# Altium PCB DT.PcbDoc (part 1 of 2)
Units mil, origin at the board's own origin, x right, y up, seen from the top; angles counter-clockwise.
Board outline 1771.65 x 787.4 mil, 2 copper layers (Top Layer, Bottom Layer), stack 57 mil thick; 61 components, 48 nets, 194 pads, 36 vias.
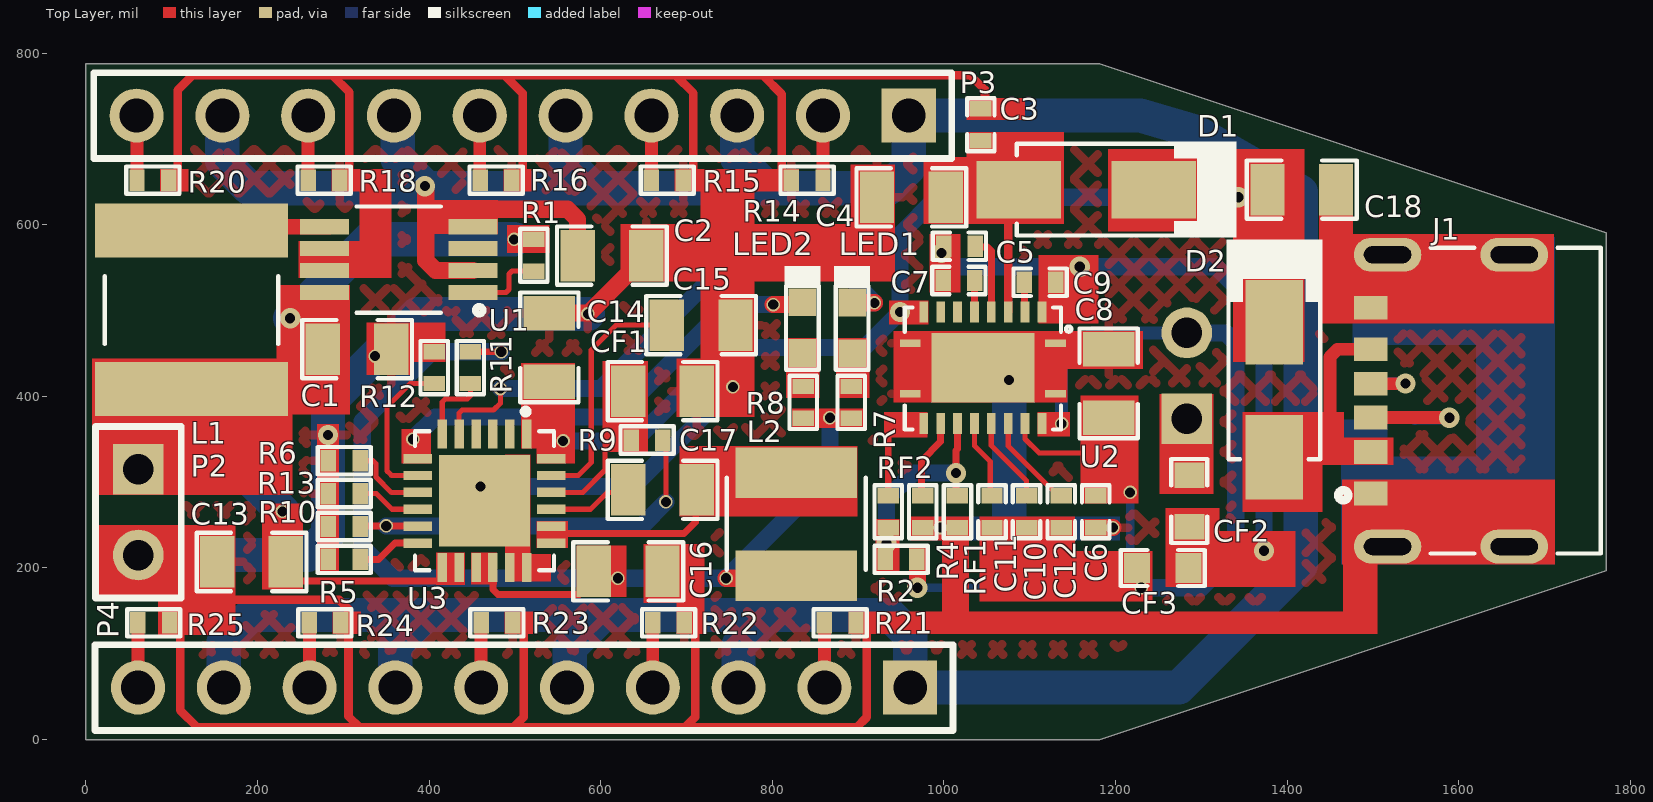
[diagram p0: Top Layer view]
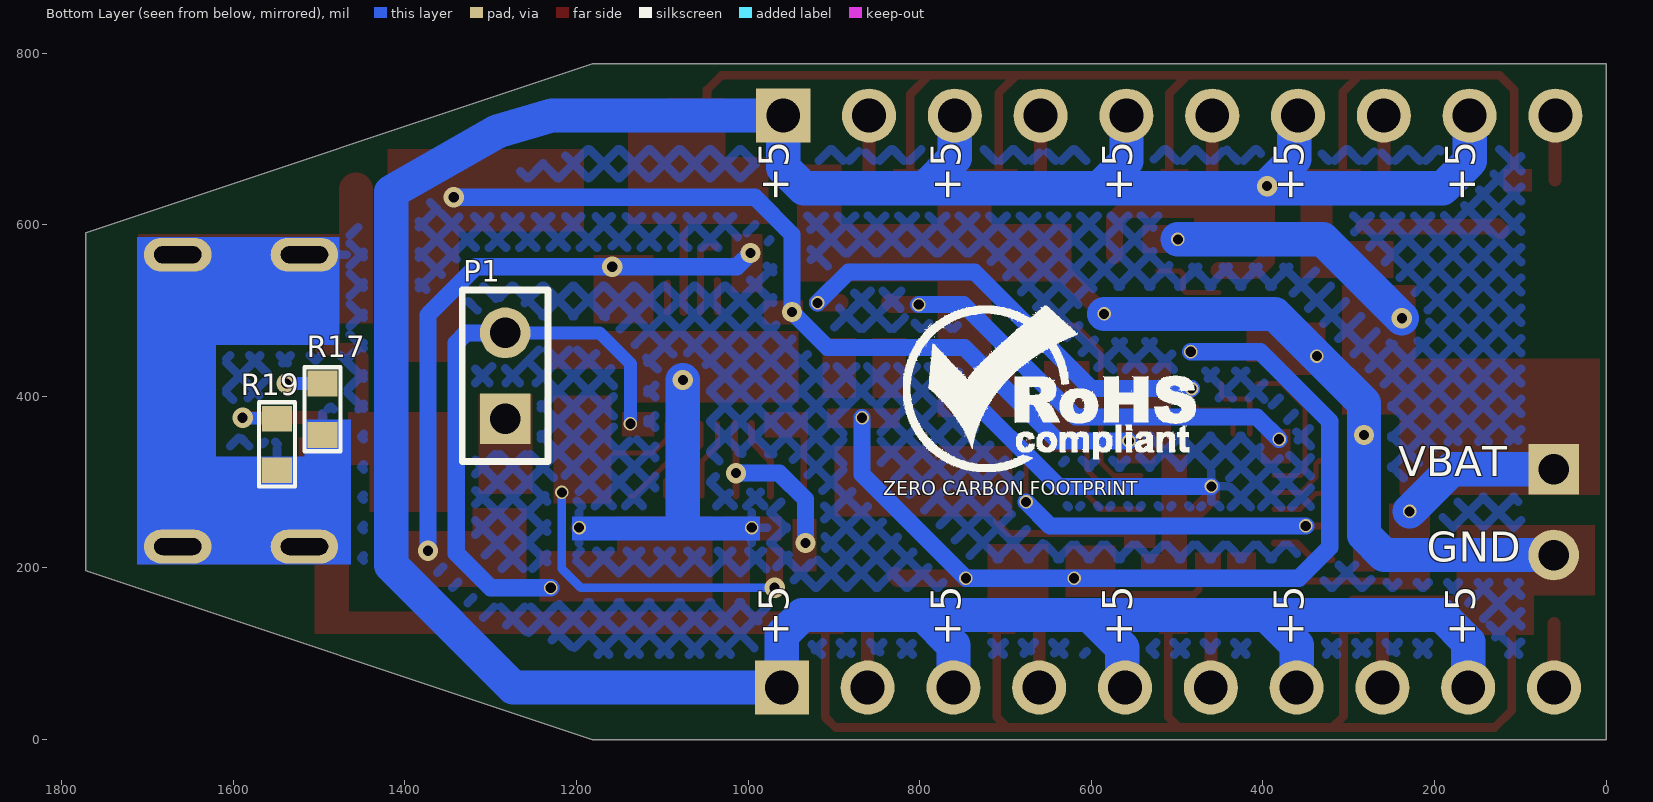
[diagram p1: Bottom Layer view, seen from below]
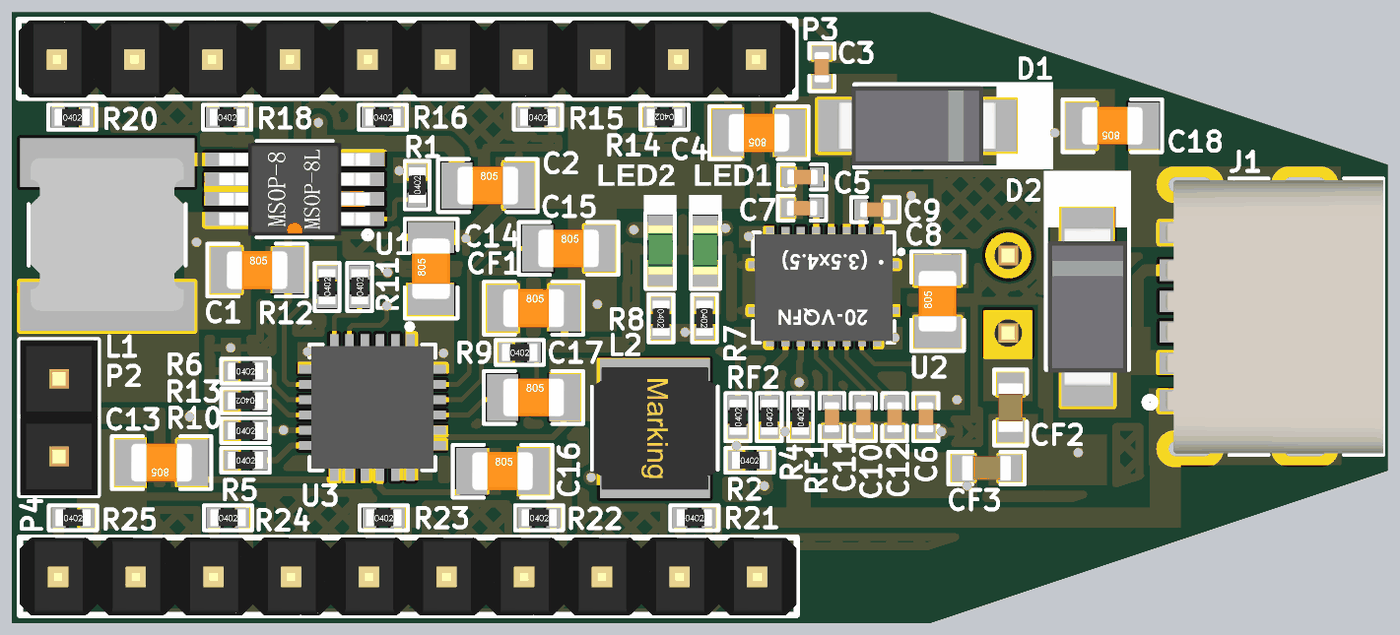
[diagram p2: 3D render of the assembled board from above, using the file's embedded part models]
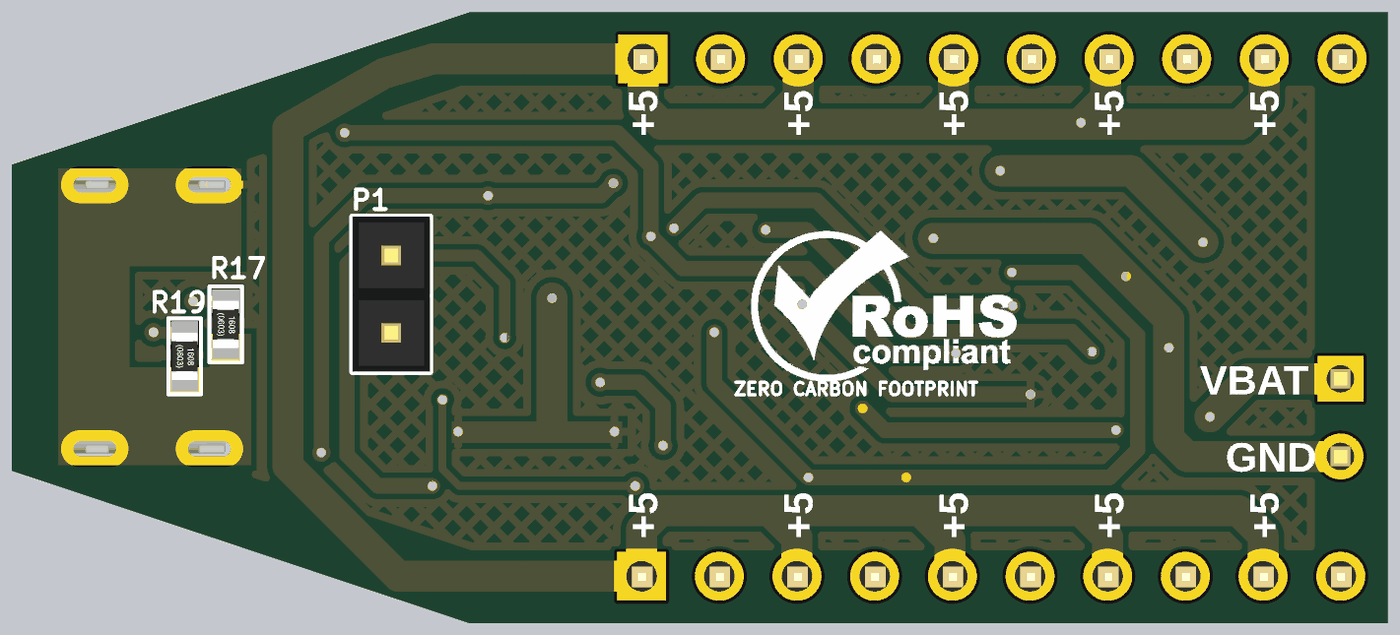
[diagram p3: 3D render of the assembled board from below, using the file's embedded part models]

## Layer stack, top to bottom
Top Solder: solder mask 3, Solder Resist, Dk 3.5
Top Layer: signal copper 10
Dielectric 1: dielectric 37, FR-4, Dk 4.8
Bottom Layer: signal copper 10
Bottom Solder: solder mask 3, Solder Resist, Dk 3.5

## Board outline
0,0 1181.1,0 1771.65,196.85 1771.65,590.55 1181.1,787.4 0,787.4

## Design rules (kind name [scope] priority, off if disabled: settings)
Clearance [All] p1: gap=7 ignorepadtopadclearanceinfootprint=FALSE except(0: Arc-Hole Track-Hole SMDPad-Hole THPad-Hole Via-Hole Fill-Hole Poly-Hole Region-Hole Text-Hole; 4: Arc-SMDPad Track-SMDPad SMDPad-SMDPad)
HoleSize [All] p1: absolutevalues=TRUE maxlimit=1000 minlimit=1 maxpercent=80.000 minpercent=20.000
HoleToHoleClearance [All] p1: gap=0 allowstackedmicrovias=TRUE
MinimumSolderMaskSliver [All] p1: minsoldermaskwidth=0
PolygonConnect [All] p1: connectstyle=Relief reliefconductorwidth=10 reliefentries=4 polygonreliefangle="90 Angle" airgapwidth=10
RoutingVias [All] p1: holewidth=11.81 width=23.62 viastyle="Through Hole" minholewidth=11.81 minwidth=15.75 maxholewidth=11.81 maxwidth=23.62
SilkToSilkClearance [All] p1: silktosilkclearance=0
SilkToSolderMaskClearance [IsPad] p1: minsilkscreentomaskgap=0 clearancetoexposedcopper=TRUE
SolderMaskExpansion [All] p1: expansion=4 istentingtop=FALSE
Width [All] p1: maxlimit=40 minlimit=6 preferedwidth=20
25 further rules are at their usual default settings.

## Classes and differential pairs
component class U_Power_Section: C1 C2 L1 R1 U1
component class U_Connector_Section: C18 D2 J1 P2 P3 P4 R14 R15 R16 R17 R18 R19 R20 R21 R22 R23 R24 R25
component class U_Battery_Charging_Section: C3 C4 C5 C6 C7 C8 C9 C10 C11 C12 C13 C14 C15 C16 C17 CF1 CF2 CF3 D1 L2 LED1 LED2 P1 R2 R4 R5 R6 R7 R8 R9 R10 R11 R12 R13 RF1 RF2 U2 U3

## Components (designator, comment, footprint, x,y, rotation, side; value= is the part's Value field where it differs from the comment)
C1 "10uF" Cap0805 316,455 r0 top locked
C2 "10uF" Cap0805 613,564 r0 top locked
C3 "0.1uF" Cap0402 1043,716.5 r90 top locked
C4 "10uF" Cap0805 962,632 r180 top locked
C5 "0.47uF" Cap0402 1018,575 r0 top locked
C6 "0.1uF" Cap0402 1177,265.5 r270 top locked
C7 "0.022UF" Cap0402 1017.5,535 r0 top locked
C8 "10uF" Cap0805 1192,415 r90 top locked
C9 "10nF" Cap0402 1112,533 r180 top locked
C10 "0.47uF" Cap0402 1096.33,265.5 r90 top locked
C11 "0.022UF" Cap0402 1056,265.5 r90 top locked
C12 "10nF" Cap0402 1136.67,265.5 r90 top locked
C13 "10uF" Cap0805 193,207 r180 top locked
C14 "1uF" Cap0805 540,457 r90 top locked
C15 "10uF" Cap0805 717,483 r0 top locked
C16 "10uF" Cap0805 632,196 r0 top locked
C17 "47nF" Cap0805 672,291 r0 top locked
C18 "1uF" Cap0805 1417,641 r180 top locked
CF1 "4.7uF" Cap0805 672,406 r0 top locked
CF2 "150nF" "Cap 0603" 1286,278 r90 top locked
CF3 "2.2nF" "Cap 0603" 1255,200 r0 top locked
D1 "SK56A-LTP" SMA 1166,641 r180 top locked
D2 "SK56A-LTP" SMA 1385,407.74 r270 top locked
J1 "U262-061N-4BVC11" U262-061N-4BVC11 1581,395 r90 top locked
L1 "4.7uH" SRN5020-4R7M 123,501 r90 top locked
L2 "1uH" 74404041010 828,251 r270 top locked
LED1 "LT Q39E-Q1OO-25-1" "LED 0603" 893,479.91 r90 top locked
LED2 "LT Q39E-Q1OO-25-1" "LED 0603" 835,480 r90 top locked
P1 "61300211121" HDR1X2 1283,374 r90 bottom locked
P2 "61300211121" HDR1X2 61,315 r270 top locked
P3 "M20-9991045" HDR1X10 958.98,727.24 r180 top locked
P4 "M20-9991045" HDR1X10 960.63,60.63 r180 top locked
R1 "1M" Res0402 522,564.5 r90 top locked
R2 "20K" Res0402 950,210 r0 top locked
R4 "10K" Res0402 975.33,265.5 r90 top locked
R5 "10K" Res0402 301,210 r0 top locked
R6 "10K" Res0402 301,325 r0 top locked
R7 "2.21K" Res0402 892,393 r270 top locked
R8 "10K" Res0402 836,393 r270 top locked
R9 "10K" Res0402 654,349 r0 top locked
R10 "10K" Res0402 301,248.33 r0 top locked
R11 "10K" Res0402 448,433.5 r90 top locked
R12 "158R" Res0402 406,433.5 r90 top locked
R13 "221R" Res0402 301,286.67 r180 top locked
R14 "1K" Res0402 840.5,652 r180 top locked
R15 "1K" Res0402 677.5,652 r0 top locked
R16 "1K" Res0402 478,652 r0 top locked
R17 "5.1K" Res0603 1496,385 r90 bottom locked
R18 "1K" Res0402 277.5,652 r0 top locked
R19 "5.1K" Res0603 1549,344 r90 bottom locked
R20 "1K" Res0402 78,652 r0 top locked
R21 "1K" Res0402 879,136 r0 top locked
R22 "1K" Res0402 679,136 r0 top locked
R23 "1K" Res0402 479,136 r0 top locked
R24 "1K" Res0402 278.5,136 r0 top locked
R25 "1K" Res0402 79,136 r0 top locked
RF1 "196R" Res0402 1015.67,265.5 r90 top locked
RF2 "66.5R" Res0402 935,265.5 r90 top locked
U1 "MCP1643T-I/MS" 8-MSOP 364.39,559.39 r180 top locked
U2 "BQ51013BRHLR" 20QFN 1045.35,433.46 r270 top locked
U3 "BQ25616JRTWR" "24-WQFN (4x4)" 464.47,278.24 r270 top locked

## Footprints (in the part's own frame and the unit in brackets; to place one, negate y for a bottom-side part, rotate by r counter-clockwise, add the part's x,y. Pads: shape width x height; smd on the part's side, far side on the other; paste and mask are expansions set on the pad)
8-MSOP [mm]
  rect 1.45x0.45 smd: 1(-2.2,0.975) 2(-2.2,0.325) 3(-2.2,-0.325) 4(-2.2,-0.975) 5(2.2,-0.975) 6(2.2,-0.325) 7(2.2,0.325) 8(2.2,0.975)
  silkscreen extent -2.5,-1.57 1.24,1.61, body extent -2.46,-1.53 2.46,1.53, height 1.01
20QFN [mm]
  rect 0.22x0.62 smd: 1(-0.725,2.15) 10(-0.725,-2.15) 11(0.775,-2.15) 20(0.775,2.15)
  rect 0.62x0.26 smd: 2(-1.65,1.75) 3(-1.65,1.25) 4(-1.65,0.75) 5(-1.65,0.25) 6(-1.65,-0.25) 7(-1.65,-0.75) 8(-1.65,-1.25) 9(-1.65,-1.75) 12(1.65,-1.75) 13(1.65,-1.25) 14(1.65,-0.75) 15(1.65,-0.25) 16(1.65,0.25) 17(1.65,0.75) 18(1.65,1.25) 19(1.65,1.75)
  rect 2.05x3.05 smd: 21(0,0)
  silkscreen extent -1.78,-2.31 1.83,2.62, body extent -1.73,-2.26 1.79,2.26, height 0.88
"24-WQFN (4x4)" [mm]
  rect 0.85x0.28 smd: 1(-1.975,1.25) 2(-1.975,0.75) 3(-1.975,0.25) 4(-1.975,-0.25) 5(-1.975,-0.75) 6(-1.975,-1.25) 13(1.975,-1.25) 14(1.975,-0.75) 15(1.975,-0.25) 16(1.975,0.25) 17(1.975,0.75) 18(1.975,1.25)
  rect 0.28x0.85 smd: 7(-1.25,-1.975) 8(-0.75,-1.975) 9(-0.25,-1.975) 10(0.25,-1.975) 11(0.75,-1.975) 12(1.25,-1.975) 19(1.25,1.975) 20(0.75,1.975) 21(0.25,1.975) 22(-0.25,1.975) 23(-0.75,1.975) 24(-1.25,1.975)
  rect 2.7x2.7 smd: 25(0,0)
  silkscreen extent -2.72,-2.06 2.06,2.06, body extent -2,-2 2,2, height 0.78
74404041010 [mm]
  rect 1.5x3.6 smd: 1(-1.525,0) 2(1.525,0)
  silkscreen extent -1.37,-2.06 1.35,2.06, body extent -2,-2 2,2, height 1.17
Cap0402 [mil]
  rect 18x25 smd mask+2.36: 1(-18.5,0) 2(18.5,0)
  silkscreen extent -31,-16 31,16, body extent -20,-10 20,10, height 19
Cap0805 [mil] "SMD 0805"
  rect 40x60 smd mask+2.76: 1(-40,0) 2(40,0)
  silkscreen extent -64,-34 64,34, body extent -39,-25 39,25, height 30
"Cap 0603" [mil]
  rect 30x35 smd mask+2.36: 1(-30,0) 2(30,0)
  silkscreen extent -49,-21 49,21, body extent -32,-16 31,16, height 34
HDR1X2 [mm] "CONN HEADER VERT 2POS 2.54MM"
  rect 1.5x1.5 hole 0.9: 1(0,0)
  round 1.5 hole 0.9: 2(2.54,0)
  silkscreen extent -1.27,-1.27 3.81,1.27, body extent -1.27,-1.27 3.81,1.27, height 8.44
HDR1X10 [mm] "Connector; Header; 10 Position"
  rect 1.6x1.6 hole 1: 1(0,0)
  round 1.6 hole 1: 2(2.54,0) 3(5.08,0) 4(7.62,0) 5(10.16,0) 6(12.7,0) 7(15.24,0) 8(17.78,0) 9(20.32,0) 10(22.86,0)
  silkscreen extent -1.27,-1.27 24.13,1.27, body extent -1.27,-1.27 24.13,1.27, height 9.4
"LED 0603" [mm] "LED 0603"
  rect 0.82x0.82 smd: 1(-0.75,0) 2(0.75,0)
  silkscreen extent -1.24,-0.53 1.83,0.53, body extent -0.77,-0.4 0.83,0.4, height 0.38
Res0402 [mil]
  rect 18x25 smd mask+4: 1(-18.5,0) 2(18.5,0)
  silkscreen extent -32,-17 32,16, body extent -23,-11 23,11, height 16
Res0603 [mil]
  rect 30x35 smd: 1(-30,0) 2(30,0)
  silkscreen extent -49,-21 49,21, body extent -31,-17 31,17, height 18
SMA [mm]
  rect 2.5x1.7 smd: 1(-2,0) 2(2,0)
  silkscreen extent -4.45,-1.42 2.06,1.42, body extent -2.6,-1.3 2.6,1.3, height 2.4
SRN5020-4R7M [mm]
  rect 1.6x5.7 smd: 1(-2.35,0) 2(2.35,0)
  silkscreen extent -1.02,-2.57 0.99,2.57, body extent -2.5,-2.5 2.5,2.5, height 2
U262-061N-4BVC11 [mm]
  rect 0.7x1 smd: A5(0.5,2.125) A9(1.52,2.125) A12(2.75,2.125) B5(-0.5,2.125) B9(-1.52,2.125) B12(-2.75,2.125)
  oval 1x2 hole 0.5 slot 1.4 at 90 deg: MH1(-4.32,1.625) MH2(4.32,1.625) MH3(4.32,-2.125) MH4(-4.32,-2.125)
  silkscreen extent -4.52,-4.69 4.52,3.09, body extent -4.47,-4.69 4.47,2.4, height 3.3

## Part data
C1 C2 C15 C16: library part TMK212BBJ106KGHT, "CAP CER 10UF 25V X5R 0805", Case Code (Imperial)=0805, Case Code (Metric)=2012, Dielectric=X5R, Manufacturer="Taiyo Yuden", Max Operating Temperature=85°C, Min Operating Temperature=-55°C, Package Quantity=3000, Ratings=AEC-Q200, Supplier Part Number 1=95Y2170, Tolerance=10%, Voltage Rating=25V, Capacitance=10uF, Case/Package=0805, Category="Ceramic Capacitors", ComponentLink1Description=http://www.mouser.com/ds/2/396/mlcc11_hq_e-541564.pdf?src-supplier=Mouser, ComponentLink1URL=http://www.mouser.com/ds/2/396/mlcc11_hq_e-541564.pdf?src-supplier=Mouser, ComponentLink2Description=https://www.yuden.co.jp/productdata/catalog/mlcc_all_hq_e.pdf?src-supplier=Digi-Key, ComponentLink2URL=https://www.yuden.co.jp/productdata/catalog/mlcc_all_hq_e.pdf?src-supplier=Digi-Key, ComponentLink3Description=http://ds.yuden.co.jp/TYCOMPAS/ut/detail.do?productNo=TMK212BBJ106KGHT&fileName=TMK212BBJ106KGHT_SS&mode=specSheetDownload&src-supplier=Digi-Key, ComponentLink3URL=http://ds.yuden.co.jp/TYCOMPAS/ut/detail.do?productNo=TMK212BBJ106KGHT&fileName=TMK212BBJ106KGHT_SS&mode=specSheetDownload&src-supplier=Digi-Key, ComponentLink4Description=http://ds.yuden.co.jp/TYCOMPAS/ut/detail.do?productNo=TMK212BBJ106KGHT&dataUnit=M&src-supplier=Avnet, ComponentLink4URL=http://ds.yuden.co.jp/TYCOMPAS/ut/detail.do?productNo=TMK212BBJ106KGHT&dataUnit=M&src-supplier=Avnet, Height=1.25mm, Length=0.079inch, Manufacturer Part Number=TMK212BBJ106KGHT, Mount="Surface Mount", Packaging="Tape and Reel", Pricing 1="1=0.06100, 25=0.06100, 50=0.06100, 100=0.06100, 250=0.06100, 500=0.05600 (USD)", RoHS=Yes, RoHS Compliant=Yes, Stock 1=26354, Supplier 1=Newark, Termination=SMD/SMT, Thickness=0.053inch, Voltage Rating (DC)=25V, Weight=0.000194oz, Width=0.049inch
C3 C6: library part GCM155R71C104KA55D, "CAP CER 0.1UF 16V X7R 0402", Capacitance=100nF, Case Code (Imperial)=0402, Case Code (Metric)=1005, Dielectric=X7R, Manufacturer=Murata, Max Operating Temperature=125°C, Min Operating Temperature=-55°C, Package Quantity=1, Ratings=AEC-Q200, Tolerance=10%, Voltage=16V, Case/Package=0402, Category="Ceramic Capacitors", ComponentLink1Description=https://datasheet.ciiva.com/11786/0900766b80ef92d0-11786380.pdf?src-supplier=RSComponents, ComponentLink1URL=https://datasheet.ciiva.com/11786/0900766b80ef92d0-11786380.pdf?src-supplier=RSComponents, ComponentLink2Description=https://datasheet.ciiva.com/18183/getdatasheetpartid-220774-18183517.pdf?src-supplier=Verical, ComponentLink2URL=https://datasheet.ciiva.com/18183/getdatasheetpartid-220774-18183517.pdf?src-supplier=Verical, ComponentLink3Description=https://datasheet.ciiva.com/164/product-164315.pdf?src-supplier=Digi-Key, ComponentLink3URL=https://datasheet.ciiva.com/164/product-164315.pdf?src-supplier=Digi-Key, ComponentLink4Description=https://datasheet.ciiva.com/164/product-164316.pdf?src-supplier=Digi-Key, ComponentLink4URL=https://datasheet.ciiva.com/164/product-164316.pdf?src-supplier=Digi-Key, ComponentLink5Description=https://datasheet.ciiva.com/11463/product-11463804.pdf?src-supplier=Avnet, ComponentLink5URL=https://datasheet.ciiva.com/11463/product-11463804.pdf?src-supplier=Avnet, ComponentLink6Description=https://datasheet.ciiva.com/2989/product-2989234.pdf?src-supplier=Avnet, ComponentLink6URL=https://datasheet.ciiva.com/2989/product-2989234.pdf?src-supplier=Avnet, Construction=Flat, Depth=0.5mm, Height=0.5mm, Lead Free="Lead Free", Length=1mm, Manufacturer Part Number=GCM155R71C104KA55D, Mount="Surface Mount", Packaging="Tape and Reel", Pricing 1="10000=0.01580, 20000=0.00950, 30000=0.00700, 50000=0.00600, 100000=0.00530, 250000=0.00470 (USD)", Radiation Hardening=No, REACH SVHC="No SVHC", RoHS=Yes, RoHS Compliant=Yes, Series=GCM, Stock 1=16570000, Supplier 1="Arrow Electronics", Supplier Part Number 1=GCM155R71C104KA55D, Termination=SMD/SMT, Thickness=0.022inch, Voltage Rating=16V, Voltage Rating (DC)=16V, Width=0.02inch
C4 C8 C13: library part CL21A106KOQNNNE, "CAP CER 10UF 16V X5R 0805", Case Code (Imperial)=0805, Case Code (Metric)=2012, Dielectric=X7R, Manufacturer=Samsung, Max Operating Temperature=85°C, Min Operating Temperature=-55°C, Package Quantity=1, Tolerance=10%, Voltage=16V, Capacitance=10uF, Case/Package=0805, Category="Ceramic Capacitors", ComponentLink1Description=https://datasheet.ciiva.com/25798/cl21a106koqnnne-25798133.pdf?src-supplier=Digi-Key, ComponentLink1URL=https://datasheet.ciiva.com/25798/cl21a106koqnnne-25798133.pdf?src-supplier=Digi-Key, Construction=Flat, Depth=1.25mm, Height=1.25mm, Lead Free="Lead Free", Length=2mm, Manufacturer Part Number=CL21A106KOQNNNE, Mount="Surface Mount", Packaging="Tape and Reel", Pricing 1="1=0.12910, 10=0.07710, 25=0.07240, 100=0.03710, 250=0.03390, 500=0.02700, 1000=0.02450 (USD)", Radiation Hardening=No, RoHS=Yes, RoHS Compliant=Yes, Series=CL, Stock 1=2592, Supplier 1="Arrow Electronics", Supplier Part Number 1=CL21A106KOQNNNE, Thickness=0.055inch, Voltage Rating=16V, Voltage Rating (DC)=16V, Width=0.049inch
C5 C10: library part CL05A474KA5NNNC, "CAP CER 0.47UF 25V X5R 0402", Capacitance=470nF, Case Code (Imperial)=0402, Case Code (Metric)=1005, Manufacturer=Samsung, Max Operating Temperature=85°C, Min Operating Temperature=-55°C, Package Quantity=1, Tolerance=10%, Voltage Rating=25V, Case/Package=0402, Category="Ceramic Capacitors", ComponentLink1Description=https://datasheet.ciiva.com/25796/cl05a474ka5nnnc-25796037.pdf?src-supplier=Digi-Key, ComponentLink1URL=https://datasheet.ciiva.com/25796/cl05a474ka5nnnc-25796037.pdf?src-supplier=Digi-Key, ComponentLink2Description=https://datasheet.ciiva.com/29198/458859-da-01-en-vs-kondensator-0402-29198303.pdf?src-supplier=Conrad, ComponentLink2URL=https://datasheet.ciiva.com/29198/458859-da-01-en-vs-kondensator-0402-29198303.pdf?src-supplier=Conrad, Lead Free="Lead Free", Length=0.039inch, Manufacturer Part Number=CL05A474KA5NNNC, Material=Ceramic, Mount="Surface Mount", Packaging="Tape and Reel", Pricing 1="1=0.21210, 10=0.14750, 25=0.14620, 100=0.07650, 250=0.07580, 500=0.04790, 1000=0.04210, 3000=0.03990, 6000=0.03590, 15000=0.03070, 30000=0.02720 (USD)", RoHS=Yes, RoHS Compliant=Yes, Series=CL, Stock 1=72150, Supplier 1="Arrow Electronics", Supplier Part Number 1=CL05A474KA5NNNC, Thickness=0.022inch, Voltage Rating (DC)=25V, Width=0.02inch
C7 C11: library part GCM155R71E223KA55J, "CAP CER 0.022UF 25V X7R 0402", Capacitance=22nF, Case Code (Imperial)=0402, Case Code (Metric)=1005, Dielectric=X7R, Manufacturer=Murata, Max Operating Temperature=125°C, Min Operating Temperature=-55°C, Package Quantity=50000, Ratings=AEC-Q200, Tolerance=10%, Voltage Rating=25V, Case/Package=0402, Category="Ceramic Capacitors", ComponentLink1Description=https://datasheet.ciiva.com/11619/product-11619415.pdf?src-supplier=Avnet, ComponentLink1URL=https://datasheet.ciiva.com/11619/product-11619415.pdf?src-supplier=Avnet, ComponentLink2Description=https://datasheet.ciiva.com/29534/s0717e-29534409.pdf?src-supplier=Digi-Key, ComponentLink2URL=https://datasheet.ciiva.com/29534/s0717e-29534409.pdf?src-supplier=Digi-Key, ComponentLink3Description=https://datasheet.ciiva.com/29534/s0717e-29534410.pdf?src-supplier=Digi-Key, ComponentLink3URL=https://datasheet.ciiva.com/29534/s0717e-29534410.pdf?src-supplier=Digi-Key, ComponentLink4Description=https://datasheet.ciiva.com/29534/s0717e-29534411.pdf?src-supplier=Digi-Key, ComponentLink4URL=https://datasheet.ciiva.com/29534/s0717e-29534411.pdf?src-supplier=Digi-Key, Construction=Flat, Depth=0.5mm, Height=0.5mm, Length=1mm, Manufacturer Part Number=GCM155R71E223KA55J, Mount="Surface Mount", Packaging="Tape and Reel", Pricing 1="1=0.08670, 10=0.04510, 25=0.04370, 100=0.02140, 250=0.02110, 500=0.01450, 1000=0.01190, 3000=0.01110, 6000=0.00980, 15000=0.00910, 30000=0.00900 (USD)", Radiation Hardening=No, RoHS=Yes, RoHS Compliant=Yes, Series=GCM, Stock 1=63139, Supplier 1="Arrow Electronics", Supplier Part Number 1=GCM155R71E223KA55J, Termination=SMD/SMT, Thickness=0.022inch, Voltage Rating (DC)=25V, Width=0.02inch
C9 C12: library part GRM155R71E103KA01D, "CAP CER 10000PF 25V X7R 0402", Case Code (Imperial)=0402, Case Code (Metric)=1005, Dielectric=X7R, Dielectric Material=Ceramic, Insulation Resistance=10GR, Manufacturer=Murata, Max Operating Temperature=125°C, Min Operating Temperature=-55°C, Package Quantity=1, Tolerance=10%, Voltage=25V, Capacitance=10nF, Case/Package=0402, Category="Ceramic Capacitors", ComponentLink1Description=https://datasheet.ciiva.com/28534/1699889-28534148.pdf?src-supplier=Element14, ComponentLink1URL=https://datasheet.ciiva.com/28534/1699889-28534148.pdf?src-supplier=Element14, ComponentLink2Description=https://datasheet.ciiva.com/129/partnumbering-e-01-129742.pdf?src-supplier=Digi-Key, ComponentLink2URL=https://datasheet.ciiva.com/129/partnumbering-e-01-129742.pdf?src-supplier=Digi-Key, ComponentLink3Description=https://datasheet.ciiva.com/129/partnumbering-e-01-129741.pdf?src-supplier=Digi-Key, ComponentLink3URL=https://datasheet.ciiva.com/129/partnumbering-e-01-129741.pdf?src-supplier=Digi-Key, ComponentLink4Description=https://datasheet.ciiva.com/129/partnumbering-e-01-129743.pdf?src-supplier=Digi-Key, ComponentLink4URL=https://datasheet.ciiva.com/129/partnumbering-e-01-129743.pdf?src-supplier=Digi-Key, ComponentLink5Description=https://datasheet.ciiva.com/11786/0900766b807a1cab-11786320.pdf?src-supplier=RSComponents, ComponentLink5URL=https://datasheet.ciiva.com/11786/0900766b807a1cab-11786320.pdf?src-supplier=RSComponents, ComponentLink6Description=https://datasheet.ciiva.com/3777/3813grm155r71e103ka0123-3777115.pdf?src-supplier=Arrow+Electronics, ComponentLink6URL=https://datasheet.ciiva.com/3777/3813grm155r71e103ka0123-3777115.pdf?src-supplier=Arrow+Electronics, ComponentLink7Description=https://datasheet.ciiva.com/18184/getdatasheetpartid-161489-18184689.pdf?src-supplier=Verical, ComponentLink7URL=https://datasheet.ciiva.com/18184/getdatasheetpartid-161489-18184689.pdf?src-supplier=Verical, ComponentLink8Description=https://datasheet.ciiva.com/29199/454154-da-01-en-vs-kondensator-0402-29199817.pdf?src-supplier=Conrad, ComponentLink8URL=https://datasheet.ciiva.com/29199/454154-da-01-en-vs-kondensator-0402-29199817.pdf?src-supplier=Conrad, ComponentLink9Description=https://datasheet.ciiva.com/7937/1747448-7937621.pdf?src-supplier=Element14, ComponentLink9URL=https://datasheet.ciiva.com/7937/1747448-7937621.pdf?src-supplier=Element14, ComponentLink10Description=https://datasheet.ciiva.com/16199/product-16199034.pdf?src-supplier=Future+Electronics, ComponentLink10URL=https://datasheet.ciiva.com/16199/product-16199034.pdf?src-supplier=Future+Electronics, Construction=Flat, Depth=0.5mm, Height=0.5mm, Lead Free="Lead Free", Length=1mm, Manufacturer Part Number=GRM155R71E103KA01D, Material=Ceramic, Mount="Surface Mount", Number of Pins=2, Packaging="Tape and Reel", Pricing 1="10000=0.00570, 20000=0.00440, 30000=0.00290, 50000=0.00280, 100000=0.00220 (USD)", Radiation Hardening=No, REACH SVHC="No SVHC", RoHS=Yes, RoHS Compliant=Yes, Series=GRM, Stock 1=1060000, Supplier 1="Arrow Electronics", Supplier Part Number 1=GRM155R71E103KA01D, Termination=SMD/SMT, Thickness=0.022inch, Voltage Rating=25V, Voltage Rating (DC)=25V, Width=0.5mm
C14 C18: library part GCM21BR71E105KA56L, "CAP CER 1UF 25V X7R 0805", Case Code (Imperial)=0805, Case Code (Metric)=2012, Dielectric=X7R, Manufacturer=Murata, Max Operating Temperature=125°C, Min Operating Temperature=-55°C, Package Quantity=3000, Ratings=AEC-Q200, Tolerance=10%, Voltage=25V, Capacitance=1uF, Case/Package=0805, Category="Ceramic Capacitors", ComponentLink1Description=https://datasheet.ciiva.com/137/product-137199.pdf?src-supplier=Digi-Key, ComponentLink1URL=https://datasheet.ciiva.com/137/product-137199.pdf?src-supplier=Digi-Key, ComponentLink2Description=https://datasheet.ciiva.com/11789/0900766b80ef92d0-11789092.pdf?src-supplier=RSComponents, ComponentLink2URL=https://datasheet.ciiva.com/11789/0900766b80ef92d0-11789092.pdf?src-supplier=RSComponents, ComponentLink3Description=https://datasheet.ciiva.com/3778/359gcm21br71e105ka5623-3778560.pdf?src-supplier=Arrow+Electronics, ComponentLink3URL=https://datasheet.ciiva.com/3778/359gcm21br71e105ka5623-3778560.pdf?src-supplier=Arrow+Electronics, ComponentLink4Description=https://datasheet.ciiva.com/18183/getdatasheetpartid-153106-18183696.pdf?src-supplier=Verical, ComponentLink4URL=https://datasheet.ciiva.com/18183/getdatasheetpartid-153106-18183696.pdf?src-supplier=Verical, ComponentLink5Description=https://datasheet.ciiva.com/137/product-137200.pdf?src-supplier=Digi-Key, ComponentLink5URL=https://datasheet.ciiva.com/137/product-137200.pdf?src-supplier=Digi-Key, ComponentLink6Description=https://datasheet.ciiva.com/137/product-137201.pdf?src-supplier=Digi-Key, ComponentLink6URL=https://datasheet.ciiva.com/137/product-137201.pdf?src-supplier=Digi-Key, ComponentLink7Description=https://datasheet.ciiva.com/2989/product-2989245.pdf?src-supplier=Avnet, ComponentLink7URL=https://datasheet.ciiva.com/2989/product-2989245.pdf?src-supplier=Avnet, ComponentLink8Description=https://datasheet.ciiva.com/2989/product-2989246.pdf?src-supplier=Avnet, ComponentLink8URL=https://datasheet.ciiva.com/2989/product-2989246.pdf?src-supplier=Avnet, Construction=Flat, Depth=1.25mm, Height=1.25mm, Lead Free="Lead Free", Length=2mm, Manufacturer Part Number=GCM21BR71E105KA56L, Mount="Surface Mount", Packaging="Tape and Reel", Pricing 1="3000=0.07110, 6000=0.06620, 12000=0.05840 (USD)", Radiation Hardening=No, REACH SVHC="No SVHC", RoHS=Yes, RoHS Compliant=Yes, Series=GCM, Stock 1=120000, Supplier 1="Arrow Electronics", Supplier Part Number 1=GCM21BR71E105KA56L, Termination=SMD/SMT, Thickness=0.055inch, Voltage Rating=25V, Voltage Rating (DC)=25V, Width=0.049inch
C17: library part CC0805KRX7R8BB473, "CAP CER 0.047UF 25V X7R 0805", Case Code (Imperial)=0805, Case Code (Metric)=2012, Dielectric=X7R, Dielectric Material=Ceramic, Insulation Resistance=100GR, Manufacturer=Yageo, Max Operating Temperature=125°C, Min Operating Temperature=-55°C, Supplier Part Number 1=603-CC805KRX7R8BB473, Tolerance=10%, Voltage Rating=25V, Capacitance=47nF, Case/Package=0805, Category="Ceramic Capacitors", ComponentLink1Description=https://datasheet.ciiva.com/13207/yageo-486313-494411-13207758.pdf?src-supplier=Mouser, ComponentLink1URL=https://datasheet.ciiva.com/13207/yageo-486313-494411-13207758.pdf?src-supplier=Mouser, ComponentLink2Description=https://datasheet.ciiva.com/11465/upy-gphc-x7r-6-3v-to-50v-8-11465303.pdf?src-supplier=Avnet, ComponentLink2URL=https://datasheet.ciiva.com/11465/upy-gphc-x7r-6-3v-to-50v-8-11465303.pdf?src-supplier=Avnet, Construction=Flat, Depth=1.25mm, Halogen Free="Halogen Free", Height=0.85mm, Lead Free="Lead Free", Length=2mm, Manufacturer Part Number=CC0805KRX7R8BB473, Mount="Surface Mount", Packaging="Tape and Reel", Pricing 1="1=0.15000, 10=0.10200, 50=0.10200, 100=0.04800, 1000=0.02900, 10000=0.02100 (USD)", Radiation Hardening=No, REACH SVHC=Unknown, Resistor Type=Ceramic, RoHS=Yes, RoHS Compliant=Yes, Series=CC, Stock 1=20092, Supplier 1=Mouser, Termination=SMD/SMT, Thickness=0.037inch, Voltage Rating (DC)=25V, Weight=0.000194oz, Width=0.049inch
CF1: library part CL21A475KPFNNNE, "CAP CER 4.7UF 10V X5R 0805", Case Code (Imperial)=0805, Case Code (Metric)=2012, Dielectric=X5R, Manufacturer=Samsung, Max Operating Temperature=85°C, Min Operating Temperature=-55°C, Package Quantity=1, Tolerance=10%, Voltage Rating=10V, Capacitance=4.7uF, Case/Package=0805, Category="Ceramic Capacitors", ComponentLink1Description=https://datasheet.ciiva.com/25766/cl21a475kpfnnne-25766898.pdf?src-supplier=Digi-Key, ComponentLink1URL=https://datasheet.ciiva.com/25766/cl21a475kpfnnne-25766898.pdf?src-supplier=Digi-Key, ComponentLink2Description=https://datasheet.ciiva.com/15216/getdatasheetpartid-358357-15216235.pdf?src-supplier=Verical, ComponentLink2URL=https://datasheet.ciiva.com/15216/getdatasheetpartid-358357-15216235.pdf?src-supplier=Verical, ComponentLink3Description=https://datasheet.ciiva.com/26310/mlcc-catalogdownload2013-eng-26310173.pdf?src-supplier=Distrelec, ComponentLink3URL=https://datasheet.ciiva.com/26310/mlcc-catalogdownload2013-eng-26310173.pdf?src-supplier=Distrelec, ComponentLink4Description=https://datasheet.ciiva.com/16374/cl05b104kq5nnnc-16374138.pdf?src-supplier=Future+Electronics, ComponentLink4URL=https://datasheet.ciiva.com/16374/cl05b104kq5nnnc-16374138.pdf?src-supplier=Future+Electronics, Construction=Flat, Contact Plating=Tin, Depth=1.25mm, Height=1.25mm, Lead Free="Lead Free", Length=2mm, Manufacturer Part Number=CL21A475KPFNNNE, Mount="Surface Mount", Packaging="Tape and Reel", Pricing 1="2000=0.01590, 4000=0.01450, 10000=0.01240, 14000=0.01230, 50000=0.00940 (USD)", Radiation Hardening=No, RoHS=Yes, RoHS Compliant=Yes, Series=CL, Stock 1=282000, Supplier 1="Arrow Electronics", Supplier Part Number 1=CL21A475KPFNNNE, Thickness=0.053inch, Voltage Rating (DC)=10V, Width=0.049inch
CF2: library part 0603F154Z250CT, "25V 150nF Y5V -20%~+80% 0603 Multilayer Ceramic Capacitors MLCC - SMD/SMT ROHS", Case Code (Metric)=1608, Case/Package=0603, Manufacturer="Walsin Tech Corp", Tolerance=-20%~+80%, Voltage=25V, Capacitance=150nF, ComponentLink1Description=LCSC, ComponentLink1URL=https://www.lcsc.com/product-detail/Multilayer-span-style-background-color-ff0-Ceramic-span-Capacitors-MLCC-SMD-SMT_Walsin-Tech-Corp-0603F154Z250CT_C237182.html, Manufacturer Part Number=0603F154Z250CT, Mount="Surface Mount"
CF3: library part CC0603JRX7R8BB222, "25V 2.2nF X7R ±5% 0603 Multilayer Ceramic Capacitors MLCC - SMD/SMT ROHS", Case Code (Metric)=1608, Case/Package=0603, Manufacturer="Walsin Tech Corp", Tolerance=±5%, Voltage=25V, Capacitance=2.2nF, ComponentLink1Description=LCSC, ComponentLink1URL=https://www.lcsc.com/product-detail/Multilayer-span-style-background-color-ff0-Ceramic-span-Capacitors-MLCC-SMD-SMT_YAGEO-CC0603JRX7R8BB222_C519522.html, Manufacturer Part Number=CC0603JRX7R8BB222, Mount="Surface Mount"
D1 D2: "DIODE SCHOTTKY 5A 60V SMA", Average Rectified Current=5A, Case/Package=SMA, Manufacturer=MCC, Max Reverse Voltage (DC)=60V, Category="Rectifier Diodes", ComponentLink1Description=http://www.mccsemi.com/up_pdf/SK52A-L-SK510A-L(DO-214AC).pdf?src-supplier=Digi-Key, ComponentLink1URL=http://www.mccsemi.com/up_pdf/SK52A-L-SK510A-L(DO-214AC).pdf?src-supplier=Digi-Key, Manufacturer Part Number=SK56A-LTP, Mount="Surface Mount", Packaging="Tape and Reel", Pricing 1="1=0.50900, 10=0.41320, 100=0.28100, 500=0.21080, 1000=0.15810, 2000=0.14490, 5000=0.13610, 10000=0.12730, 25000=0.11980 (USD)", RoHS=Yes, RoHS Compliant=Yes, Stock 1=4792, Supplier 1="Arrow Electronics", Supplier Part Number 1=SK56A-LTP
J1: "USB 3.1 1 Surface Mount 6 Female -25℃~+85℃ Type-C SMD USB Connectors ROHS", Manufacturer=XKB, ComponentLink1Description=LCSC, ComponentLink1URL=https://www.lcsc.com/product-detail/span-style-background-color-ff0-USB-span-Connectors_XKB-Connectivity-U262-061N-4BVC11_C2764612.html, Manufacturer Part Number=U262-061N-4BVC11
L1: library part SRN5020-4R7M, "FIXED IND 4.7UH 2A 72 MOHM SMD", Case/Package=2020, Current Rating=2A, DC Resistance (DCR)=72mR, Inductance Tolerance=20%, Manufacturer=Bourns, Max Operating Temperature=120°C, Min Operating Temperature=-25°C, Package Quantity=2000, Resistor Type=Wirewound, Self Resonant Frequency=30MHz, Supplier Part Number 1=652-SRN5020-4R7M, Test Frequency=100kHz, Category="Fixed Inductors", ComponentLink1Description=https://datasheet.ciiva.com/46451/1684090-46451208.pdf?src-supplier=Element14, ComponentLink1URL=https://datasheet.ciiva.com/46451/1684090-46451208.pdf?src-supplier=Element14, ComponentLink2Description=https://datasheet.ciiva.com/17111/70255680-17111900.pdf?src-supplier=Allied+Electronics, ComponentLink2URL=https://datasheet.ciiva.com/17111/70255680-17111900.pdf?src-supplier=Allied+Electronics, ComponentLink3Description=https://datasheet.ciiva.com/6689/srn5020-6689167.pdf?src-supplier=Digi-Key, ComponentLink3URL=https://datasheet.ciiva.com/6689/srn5020-6689167.pdf?src-supplier=Digi-Key, ComponentLink4Description=https://datasheet.ciiva.com/13168/srn5020-13168591.pdf?src-supplier=Mouser, ComponentLink4URL=https://datasheet.ciiva.com/13168/srn5020-13168591.pdf?src-supplier=Mouser, ComponentLink5Description=https://datasheet.ciiva.com/22717/1684090-22717782.pdf?src-supplier=Element14, ComponentLink5URL=https://datasheet.ciiva.com/22717/1684090-22717782.pdf?src-supplier=Element14, Core Material=Ferrite, DC Current=2A, Depth=5.2mm, Height=2mm, Height - Seated (Max)=0.079inch, Inductance=4.7uH, Length=5mm, Manufacturer Part Number=SRN5020-4R7M, Material=Steel, Max DC Current=2A, Military Standard=Not, Mount="Surface Mount", Number of Pins=2, Packaging="Cut Tape", Pricing 1="1=0.55000, 10=0.38000, 50=0.38000, 100=0.32900, 250=0.30900, 500=0.27900, 1000=0.23400, 2000=0.22700, 10000=0.22700 (USD)", REACH SVHC="No SVHC", RMS Current (Irms)=2A, RoHS=Yes, Saturation Current=2A, Shielding=Shielded, Stock 1=12, Supplier 1=Mouser, Termination=SMD/SMT, Tolerance=20%, Width=5mm
L2: library part 74404041010, "Fixed Ind 1UH 2.52A 41 Mohm SMD", Case/Package=Nonstandard, Current Rating=2.52A, DC Resistance (DCR)=41mR, Manufacturer="Wurth Electronics", Max Operating Temperature=125°C, Min Operating Temperature=-40°C, Resistor Type=Wirewound, Saturation Current=3.35A, Self Resonant Frequency=142MHz, Supplier Part Number 1=75AJ2600, Test Frequency=100kHz, Tolerance=30%, Category="Fixed Inductors", ComponentLink1Description=https://katalog.we-online.de/pbs/datasheet/74404041010.pdf?src-supplier=Digi-Key, ComponentLink1URL=https://katalog.we-online.de/pbs/datasheet/74404041010.pdf?src-supplier=Digi-Key, Height - Seated (Max)=0.047inch, Inductance=1uH, Length=0.157inch, Manufacturer Part Number=74404041010, Mount="Surface Mount", Packaging="Tape and Reel", Pricing 1="10=1.15000, 25=1.05000, 50=0.95300, 100=0.87100, 250=0.74200 (USD)", RoHS=Yes, RoHS Compliant=Yes, Shielding=Shielded, Stock 1=200, Supplier 1=Newark, Width=0.146inch
LED1 LED2: "LED GREEN DIFFUSED 0603 SMD", Case Code (Imperial)=0603, Case Code (Metric)=1608, Case/Package=SMD/SMT, Color=Green, Forward Current=15mA, Forward Voltage=2.85V, Lens Color=White, Manufacturer="Osram Opto", Manufacturer Part Number=LTQ39E-Q1OO-25-1, Max Operating Temperature=85°C, Min Operating Temperature=-40°C, Package Quantity=16000, Supplier Part Number 1=6973718, Test Current=5mA, Category=LEDs, ComponentLink1Description=http://www.mouser.com/ds/2/311/LT%20Q39E%20-%20CHIPLED%200603-318171.pdf?src-supplier=Mouser, ComponentLink1URL=http://www.mouser.com/ds/2/311/LT%20Q39E%20-%20CHIPLED%200603-318171.pdf?src-supplier=Mouser, ComponentLink2Description=http://components.arrow.com/part/dataview/48286240S9138660N2128?src-supplier=Arrow+Electronics, ComponentLink2URL=http://components.arrow.com/part/dataview/48286240S9138660N2128?src-supplier=Arrow+Electronics, ComponentLink3Description=https://dammedia.osram.info/media/resource/hires/osram-dam-2493475/LT%20Q39E.pdf?src-supplier=Digi-Key, ComponentLink3URL=https://dammedia.osram.info/media/resource/hires/osram-dam-2493475/LT%20Q39E.pdf?src-supplier=Digi-Key, ComponentLink4Description=http://www.osram-os.com/Graphics/XPic7/00185661_0.pdf?src-supplier=Digi-Key, ComponentLink4URL=http://www.osram-os.com/Graphics/XPic7/00185661_0.pdf?src-supplier=Digi-Key, ComponentLink5Description=http://catalog.osram-os.com/jsp/download.jsp?rootPath=/media/&name=LB_LT_Q39E.pdf&docPath=Graphics/00052413_0.pdf&url=/media//_en/Graphics/00052413_0.pdf&src-supplier=Avnet, ComponentLink5URL=http://catalog.osram-os.com/jsp/download.jsp?rootPath=/media/&name=LB_LT_Q39E.pdf&docPath=Graphics/00052413_0.pdf&url=/media//_en/Graphics/00052413_0.pdf&src-supplier=Avnet, ComponentLink6Description=http://www.osram-os.com/Graphics/XPic7/00185661_0.pdf/LT%20Q39E%20-%20CHIPLED%200603.pdf?src-supplier=Avnet, ComponentLink6URL=http://www.osram-os.com/Graphics/XPic7/00185661_0.pdf/LT%20Q39E%20-%20CHIPLED%200603.pdf?src-supplier=Avnet, Depth=0.9mm, Dominant Wavelength=530nm, Length=1.6mm, Lens Size=0.8mm, Lens Style=Flat,Diffused,Colorless,Rectangular, Lens Transparency=Diffused, Luminous Flux=0.34lm, Luminous Intensity=175.5mcd, Mount="Surface Mount", Number of Elements=1, Number of LEDs=1, Number of Pins=2, Packaging="Tape and Reel", Pricing 1="10=0.31600, 100=0.16800, 200=0.16400, 1000=0.16100, 2000=0.11500 (USD)", Radiation Hardening=No, RoHS=Yes, RoHS Compliant=Yes, Series="CHIPLED 0603", Stock 1=1, Supplier 1=RSComponents, Viewing Angle=130°, Width=0.8mm
P1 P2: "CONN HEADER VERT 2POS 2.54MM", Color=Black, Current Rating=3A, Manufacturer="Wurth Electronics", Max Operating Temperature=125°C, Min Operating Temperature=-40°C, Supplier Part Number 1=732-5315-ND, Voltage Rating=250V, ComponentLink1Description=http://www.mouser.com/ds/2/445/6130xx11121-538006.pdf?src-supplier=Mouser, ComponentLink1URL=http://www.mouser.com/ds/2/445/6130xx11121-538006.pdf?src-supplier=Mouser, Connector Type="Male Pin", Contact Gender=Male, Contact Material="Copper Alloy,Copper", Contact Mating Length=0.236inch, Contact Plating=Gold, Gender=Male, Housing Material=PBT, Lead Free="Lead Free", Manufacturer Part Number=61300211121, Mount="Through Hole", Number of Contacts=2, Number of Positions=2, Number of Rows=1, Packaging=Bulk, Pitch=0.1inch, Pricing 1="1=0.13, 10=0.106, 25=0.088, 50=0.074, 100=0.067, 1000=0.061 (USD)", REACH SVHC=Unknown, Stock 1=219205, Supplier 1=Digi-Key, Termination="Through Hole"
P3 P4: "CONN HEADER VERT 10POS 2.54MM", Case/Package=SIL, Color=Black, Contact Resistance=25mR, Current Rating=3A, Insulation Resistance=10GR, Manufacturer=Harwin, Max Operating Temperature=105°C, Min Operating Temperature=-40°C, Package Quantity=500, Supplier Part Number 1=952-1842-ND, ComponentLink1Description=http://www.mouser.com/ds/2/181/Harwin_Product_Catalog_page_206-1134556.pdf?src-supplier=Mouser, ComponentLink1URL=http://www.mouser.com/ds/2/181/Harwin_Product_Catalog_page_206-1134556.pdf?src-supplier=Mouser, ComponentLink2Description=http://www.farnell.com/cad/689114.pdf?src-supplier=Element14, ComponentLink2URL=http://www.farnell.com/cad/689114.pdf?src-supplier=Element14, Connector Type="Male Pin", Contact Material=Brass,Bronze, Contact Mating Length=0.24inch, Contact Plating=Gold, Depth=2.54mm, Gender=Male, Height=0.125inch, Housing Color=Black, Housing Material=Nylon, Length=25.4mm, Manufacturer Part Number=M20-9991045, Max Current Rating=3A, Mount="Through Hole", Number of Contacts=10, Number of Positions=10, Number of Rows=1, Orientation=Straight, Packaging=Bulk, Pitch=2.54mm, Pricing 1="1=0.44, 10=0.413, 100=0.2891, 500=0.2478, 1000=0.2065, 5000=0.177, 10000=0.1652 (USD)", Radiation Hardening=No, REACH SVHC="No SVHC", Stock 1=1623, Supplier 1=Digi-Key, Termination=Solder, Weight=0.020459oz, Width=0.5inch
R1: library part AF0402FR-071ML, "RES SMD 1M OHM 1% 1/16W 0402", Case/Package=0402, Manufacturer=Yageo, Max Operating Temperature=155°C, Max Power Dissipation=63mW, Min Operating Temperature=-55°C, Resistance=1MR, Resistor Type="Thick Film", Supplier Part Number 1=603-AF0402FR-071ML, Temperature Coefficient=100ppm/°C, Tolerance=1%, Category="Chip SMD Resistors", ComponentLink1Description=http://www.yageo.com/documents/recent/PYu-AF_51_RoHS_L_5.pdf?src-supplier=Digi-Key, ComponentLink1URL=http://www.yageo.com/documents/recent/PYu-AF_51_RoHS_L_5.pdf?src-supplier=Digi-Key, Features="Moisture Resistant,Anti-Sulfur", Height=0.015inch, Length=0.039inch, Manufacturer Part Number=AF0402FR-071ML, Number of Terminations=2, Packaging="Tape and Reel", Pricing 1="1=0.12000, 10=0.06300, 50=0.06300, 100=0.02600, 1000=0.01200, 10000=0.00700 (USD)", RoHS=Yes, RoHS Compliant=Yes, Stock 1=35543, Supplier 1=Mouser, Width=0.02inch
R2: library part RMCF0402JT20K0, "RES 20K OHM 5% 1/16W 0402", Case Code (Imperial)=0402, Case Code (Metric)=1005, Manufacturer="Stackpole Electronics", Max Operating Temperature=155°C, Max Power Dissipation=63mW, Min Operating Temperature=-55°C, Resistance=20kR, Resistor Type="Thick Film", Temperature Coefficient=100ppm/°C, Tolerance=5%, Case/Package=0402, Category="Chip SMD Resistors", ComponentLink1Description=http://www.seielect.com/Catalog/SEI-rmc.pdf?src-supplier=Future+Electronics, ComponentLink1URL=http://www.seielect.com/Catalog/SEI-rmc.pdf?src-supplier=Future+Electronics, ComponentLink2Description=https://www.seielect.com/Catalog/SEI-RMCF_RMCP.pdf?src-supplier=Avnet, ComponentLink2URL=https://www.seielect.com/Catalog/SEI-RMCF_RMCP.pdf?src-supplier=Avnet, ComponentLink3Description=https://www.seielect.com/catalog/SEI-Packaging.pdf?src-supplier=Digi-Key, ComponentLink3URL=https://www.seielect.com/catalog/SEI-Packaging.pdf?src-supplier=Digi-Key, ComponentLink4Description=https://www.seielect.com/Catalog/SEI-RMCF_RMCP.pdf?src-supplier=Digi-Key, ComponentLink4URL=https://www.seielect.com/Catalog/SEI-RMCF_RMCP.pdf?src-supplier=Digi-Key, ComponentLink5Description=http://components.arrow.com/part/dataview/50569084S772884N1174?src-supplier=Arrow+Electronics, ComponentLink5URL=http://components.arrow.com/part/dataview/50569084S772884N1174?src-supplier=Arrow+Electronics, Construction=Rectangular, Contact Plating=Tin,Matte, Depth=0.5mm, Features="Automotive AEC-Q200", Height=0.016inch, Lead Free="Lead Free", Length=0.039inch, Manufacturer Part Number=RMCF0402JT20K0, Military Standard=Not, Mount="Surface Mount", Number of Terminations=2, Packaging="Tape and Reel", Power Rating=63mW, Pricing 1="10000=0.00150, 30000=0.00130, 50000=0.00120 (USD)", RoHS=Yes, RoHS Compliant=Yes, Series=RMCF, Size Code=0402, Stock 1=30000, Supplier 1="Arrow Electronics", Supplier Part Number 1=RMCF0402JT20K0, Width=0.02inch
R4 R5 R6 R8 R9 R10 R11: library part RC0402JR-0710KP, "RES SMD 10K OHM 5% 1/16W 0402", Case Code (Imperial)=0402, Case Code (Metric)=1005, Manufacturer=Yageo, Max Operating Temperature=155°C, Max Power Dissipation=63mW, Min Operating Temperature=-55°C, Resistance=10kR, Resistor Type="Thick Film", Temperature Coefficient=150ppm/°C, Tolerance=5%, Case/Package=0402, Category="Chip SMD Resistors", ComponentLink1Description=http://www.yageo.com/NewPortal/yageodocoutput?fileName=/pdf/R-Chip/PYu-RC_51_RoHS_P_0.pdf&src-supplier=Digi-Key, ComponentLink1URL=http://www.yageo.com/NewPortal/yageodocoutput?fileName=/pdf/R-Chip/PYu-RC_51_RoHS_P_0.pdf&src-supplier=Digi-Key, Features="Moisture Resistant", Height=0.016inch, Length=0.039inch, Manufacturer Part Number=RC0402JR-0710KP, Number of Terminations=2, Packaging="Cut Tape", Pricing 1="10000=0.00290, 20000=0.00280 (USD)", RoHS=Yes, RoHS Compliant=Yes, Stock 1=70000, Supplier 1="Arrow Electronics", Supplier Part Number 1=RC0402JR-0710KP, Width=0.02inch
R7: library part AT0402BRD072K21L, "RES SMD 2.21KOHM 0.1% 1/16W 0402", Case/Package=0402, Manufacturer=Yageo, Max Operating Temperature=155°C, Max Power Dissipation=63mW, Min Operating Temperature=-55°C, Resistance=2.21kR, Resistor Type="Thin Film", Supplier Part Number 1=2145812, Temperature Coefficient=25ppm/°C, Tolerance=0.1%, Category="Chip SMD Resistors", ComponentLink1Description=http://www.yageo.com/documents/recent/PYu-AT_51_RoHS_L_5.pdf?src-supplier=Digi-Key, ComponentLink1URL=http://www.yageo.com/documents/recent/PYu-AT_51_RoHS_L_5.pdf?src-supplier=Digi-Key, Features="Moisture Resistant,Automotive AEC-Q200,Anti-Sulfur", Height=0.014inch, Length=0.039inch, Manufacturer Part Number=AT0402BRD072K21L, Number of Terminations=2, Packaging="Tape and Reel", Pricing 1="10000=0.08590, 20000=0.06460, 30000=0.06390 (USD)", RoHS=Yes, RoHS Compliant=Yes, Stock 1=10000, Supplier 1="Future Electronics", Width=0.02inch
R12: library part RC0402FR-07158RL, "RES 158 OHM 1% 1/16W 0402", Case Code (Imperial)=0402, Case Code (Metric)=1005, Manufacturer=Yageo, Max Operating Temperature=155°C, Max Power Dissipation=63mW, Min Operating Temperature=-55°C, Package Quantity=10000, Power Rating=62.5mW, Resistor Type="Thick Film", Temperature Coefficient=100ppm/°C, Tolerance=1%, Voltage Rating=50V, Case/Package=0402, Category="Chip SMD Resistors", ComponentLink1Description=https://datasheet.ciiva.com/12575/pyu-rc0402-51-rohs-l-6-r-8721-12575276.pdf?src-supplier=Mouser, ComponentLink1URL=https://datasheet.ciiva.com/12575/pyu-rc0402-51-rohs-l-6-r-8721-12575276.pdf?src-supplier=Mouser, ComponentLink2Description=https://datasheet.ciiva.com/8887/pyu-rc0402-51-rohs-l-6-8887228.pdf?src-supplier=Avnet, ComponentLink2URL=https://datasheet.ciiva.com/8887/pyu-rc0402-51-rohs-l-6-8887228.pdf?src-supplier=Avnet, ComponentLink3Description=https://datasheet.ciiva.com/16744/pyu-rc0402-51-rohs-l-6-r-16744012.pdf?src-supplier=Future+Electronics, ComponentLink3URL=https://datasheet.ciiva.com/16744/pyu-rc0402-51-rohs-l-6-r-16744012.pdf?src-supplier=Future+Electronics, Construction=Rectangular, Contact Plating=Tin,Matte,Lead, Depth=0.5mm, Features="Moisture Resistant", Height=0.016inch, Lead Free="Lead Free", Length=1mm, Manufacturer Part Number=RC0402FR-07158RL, Military Standard=Not, Number of Terminations=2, Packaging="Tape and Reel", Pricing 1="1=0.09680, 10=0.02060, 25=0.01740, 100=0.00620, 250=0.00570, 500=0.00490, 1000=0.00310 (USD)", Radiation Hardening=No, Resistance=158R, RoHS=Yes, RoHS Compliant=Yes, Series=RC, Stock 1=12524, Supplier 1="Arrow Electronics", Supplier Part Number 1=RC0402FR-07158RL, Technology="THICK FILM", Termination=SMD/SMT, Voltage Rating (DC)=50V, Width=0.02inch, Working Voltage=50V
R13: library part RC0402FR-07221RL, "RES 221 OHM 1% 1/16W 0402", Case Code (Imperial)=0402, Case Code (Metric)=1005, Manufacturer=Yageo, Max Operating Temperature=155°C, Max Power Dissipation=63mW, Min Operating Temperature=-55°C, Package Quantity=1, Power Rating=62.5mW, Resistor Type="Thick Film", Temperature Coefficient=100ppm/°C, Tolerance=1%, Voltage Rating=50V, Case/Package=0402, Category="Chip SMD Resistors", ComponentLink1Description=https://datasheet.ciiva.com/2519/pyu-r-int-thick-7-2519025.pdf?src-supplier=Digi-Key, ComponentLink1URL=https://datasheet.ciiva.com/2519/pyu-r-int-thick-7-2519025.pdf?src-supplier=Digi-Key, ComponentLink2Description=https://datasheet.ciiva.com/2519/pyu-r-int-thick-7-2519026.pdf?src-supplier=Digi-Key, ComponentLink2URL=https://datasheet.ciiva.com/2519/pyu-r-int-thick-7-2519026.pdf?src-supplier=Digi-Key, ComponentLink3Description=https://datasheet.ciiva.com/2519/pyu-r-int-thick-7-2519024.pdf?src-supplier=Digi-Key, ComponentLink3URL=https://datasheet.ciiva.com/2519/pyu-r-int-thick-7-2519024.pdf?src-supplier=Digi-Key, ComponentLink4Description=https://datasheet.ciiva.com/12666/pyu-rc0402-51-rohs-l-6-r-12666726.pdf?src-supplier=Mouser, ComponentLink4URL=https://datasheet.ciiva.com/12666/pyu-rc0402-51-rohs-l-6-r-12666726.pdf?src-supplier=Mouser, ComponentLink5Description=https://datasheet.ciiva.com/17419/pyu-rc0402-51-rohs-l-6-r-17419495.pdf?src-supplier=Future+Electronics, ComponentLink5URL=https://datasheet.ciiva.com/17419/pyu-rc0402-51-rohs-l-6-r-17419495.pdf?src-supplier=Future+Electronics, Construction=Rectangular, Depth=0.5mm, Features="Moisture Resistant", Height=0.016inch, Lead Free="Lead Free", Length=1mm, Manufacturer Part Number=RC0402FR-07221RL, Military Standard=Not, Number of Terminations=2, Packaging="Tape and Reel", Pricing 1="10000=0.00150 (USD)", Resistance=221R, RoHS=Yes, RoHS Compliant=Yes, Series=RC, Size Code=0402, Stock 1=70000, Supplier 1="Arrow Electronics", Supplier Part Number 1=RC0402FR-07221RL, Termination=SMD/SMT, Width=0.02inch
R14 R15 R16 R18 R20 R21 R22 R23 R24 R25: library part AF0402FR-071KL, "RES SMD 1K OHM 1% 1/16W 0402", Case/Package=0402, Manufacturer=Yageo, Max Operating Temperature=155°C, Max Power Dissipation=63mW, Min Operating Temperature=-55°C, Resistance=1kR, Resistor Type="Thick Film", Temperature Coefficient=100ppm/°C, Tolerance=1%, Category="Chip SMD Resistors", ComponentLink1Description=http://www.yageo.com/documents/recent/PYu-AT_51_RoHS_L_5.pdf?src-supplier=Digi-Key, ComponentLink1URL=http://www.yageo.com/documents/recent/PYu-AT_51_RoHS_L_5.pdf?src-supplier=Digi-Key, ComponentLink2Description=http://www.yageo.com/documents/recent/PYu-AF_51_RoHS_L_5.pdf?src-supplier=Digi-Key, ComponentLink2URL=http://www.yageo.com/documents/recent/PYu-AF_51_RoHS_L_5.pdf?src-supplier=Digi-Key, Features="Moisture Resistant,Anti-Sulfur", Height=0.015inch, Length=0.039inch, Manufacturer Part Number=AF0402FR-071KL, Number of Terminations=2, Packaging="Tape and Reel", Pricing 1="10000=0.00560 (USD)", RoHS=Yes, RoHS Compliant=Yes, Stock 1=60000, Supplier 1="Arrow Electronics", Supplier Part Number 1=AF0402FR-071KL, Width=0.02inch
R17 R19: library part RMCF0603JT5K10, "RES 5.1K OHM 5% 1/10W 0603", Case Code (Imperial)=0603, Case Code (Metric)=1608, Manufacturer="Stackpole Electronics", Max Operating Temperature=155°C, Max Power Dissipation=100mW, Min Operating Temperature=-55°C, Package Quantity=5000, Resistance=5.1kR, Resistor Type="Thick Film", Temperature Coefficient=200ppm/°C, Tolerance=5%, Case/Package=0603, Category="Chip SMD Resistors", ComponentLink1Description=https://www.verical.com/server-webapp/html/getDatasheet?partID=542786&src-supplier=Verical, ComponentLink1URL=https://www.verical.com/server-webapp/html/getDatasheet?partID=542786&src-supplier=Verical, ComponentLink2Description=http://components.arrow.com/part/dataview/40962028S7515679N1174?src-supplier=Arrow+Electronics, ComponentLink2URL=http://components.arrow.com/part/dataview/40962028S7515679N1174?src-supplier=Arrow+Electronics, ComponentLink3Description=https://www.seielect.com/catalog/sei-rmcf_rmcp.pdf?src-supplier=Digi-Key, ComponentLink3URL=https://www.seielect.com/catalog/sei-rmcf_rmcp.pdf?src-supplier=Digi-Key, ComponentLink4Description=https://www.seielect.com/catalog/SEI-RMCF_RMCP.pdf?src-supplier=Avnet, ComponentLink4URL=https://www.seielect.com/catalog/SEI-RMCF_RMCP.pdf?src-supplier=Avnet, ComponentLink5Description=http://www.seielect.com/catalog/sei-rmc.pdf?src-supplier=Future+Electronics, ComponentLink5URL=http://www.seielect.com/catalog/sei-rmc.pdf?src-supplier=Future+Electronics, Construction=Rectangular, Contact Plating=Tin,Matte, Depth=0.8mm, Features="Automotive AEC-Q200", Height=0.022inch, Lead Free="Lead Free", Length=1.55mm, Manufacturer Part Number=RMCF0603JT5K10, Military Standard=Not, Mount="Surface Mount", Number of Terminations=2, Packaging="Tape and Reel", Power Rating=100mW, Pricing 1="5000=0.00190, 10000=0.00160, 25000=0.00140, 50000=0.00120 (USD)", Radiation Hardening=No, RoHS=Yes, RoHS Compliant=Yes, Series=RMCF, Size Code=0603, Stock 1=335000, Supplier 1="Arrow Electronics", Supplier Part Number 1=RMCF0603JT5K10, Width=0.031inch
RF1: library part RC0402FR-07196RL, "RES 196 OHM 1% 1/16W 0402", Case Code (Imperial)=0402, Case Code (Metric)=1005, Manufacturer=Yageo, Max Operating Temperature=155°C, Max Power Dissipation=63mW, Min Operating Temperature=-55°C, Power Rating=62.5mW, Resistor Type="Thick Film", Temperature Coefficient=100ppm/°C, Tolerance=1%, Voltage Rating=50V, Case/Package=0402, Category="Chip SMD Resistors", ComponentLink1Description=https://datasheet.ciiva.com/16743/pyu-rc0402-51-rohs-l-6-r-16743909.pdf?src-supplier=Future+Electronics, ComponentLink1URL=https://datasheet.ciiva.com/16743/pyu-rc0402-51-rohs-l-6-r-16743909.pdf?src-supplier=Future+Electronics, Construction=Rectangular, Contact Plating=Tin,Matte,Lead, Depth=0.5mm, Features="Moisture Resistant", Height=0.016inch, Lead Free="Lead Free", Length=0.039inch, Manufacturer Part Number=RC0402FR-07196RL, Military Standard=Not, Number of Terminations=2, Packaging="Tape and Reel", Pricing 1="1=0.09750, 10=0.01520, 25=0.01330, 100=0.00540, 250=0.00430, 1000=0.00270, 3000=0.00210 (USD)", Radiation Hardening=No, Resistance=196R, RoHS=Yes, RoHS Compliant=Yes, Series=RC, Stock 1=13037, Supplier 1="Arrow Electronics", Supplier Part Number 1=RC0402FR-07196RL, Termination=SMD/SMT, Voltage Rating (DC)=50V, Width=0.02inch
RF2: library part WR04X66R5FTL, "62.5mW 50V ±1% ±100ppm/℃ -55℃~+155℃ 66.5Ω 0402 Chip Resistor - Surface Mount ROHS", Case Code (Metric)=1005, Case/Package=0402, Manufacturer="Walsin Tech Corp", Tolerance=1%, ComponentLink1Description=LCSC, ComponentLink1URL=https://www.lcsc.com/product-detail/span-style-background-color-ff0-Chip-span-span-style-background-color-ff0-Resistor-span-Surface-Mount_Walsin-Tech-Corp-WR04X66R5FTL_C368442.html, Manufacturer Part Number=WR04X66R5FTL, Mount="Surface Mount", Resistance=66.5R